# Altium PCB MiniPC.PcbDoc (part 10 of 24)
Units mm, origin at the board's own origin, x right, y up, seen from the top; angles counter-clockwise.
Board outline 175 x 155 mm, 16 copper layers (1_Top, 2_int1_(gnd), 3_int2_(power), 4_int3_(gnd), 5_int4_(sign), 6_int5_(power), 7_int6_(sign), 8_int7_(power), 9_int8_(gnd), 10_int9_(sign), 11_int10_(gnd), 12_int11_(sign), 13_int12_(gnd), 14_int13_(power), 15_int14_(gnd), 16_Bottom), stack 2.008 mm thick; 1046 components, 837 nets, 6010 pads, 4009 vias.
Unrouted connection lines stored in the file: 564.
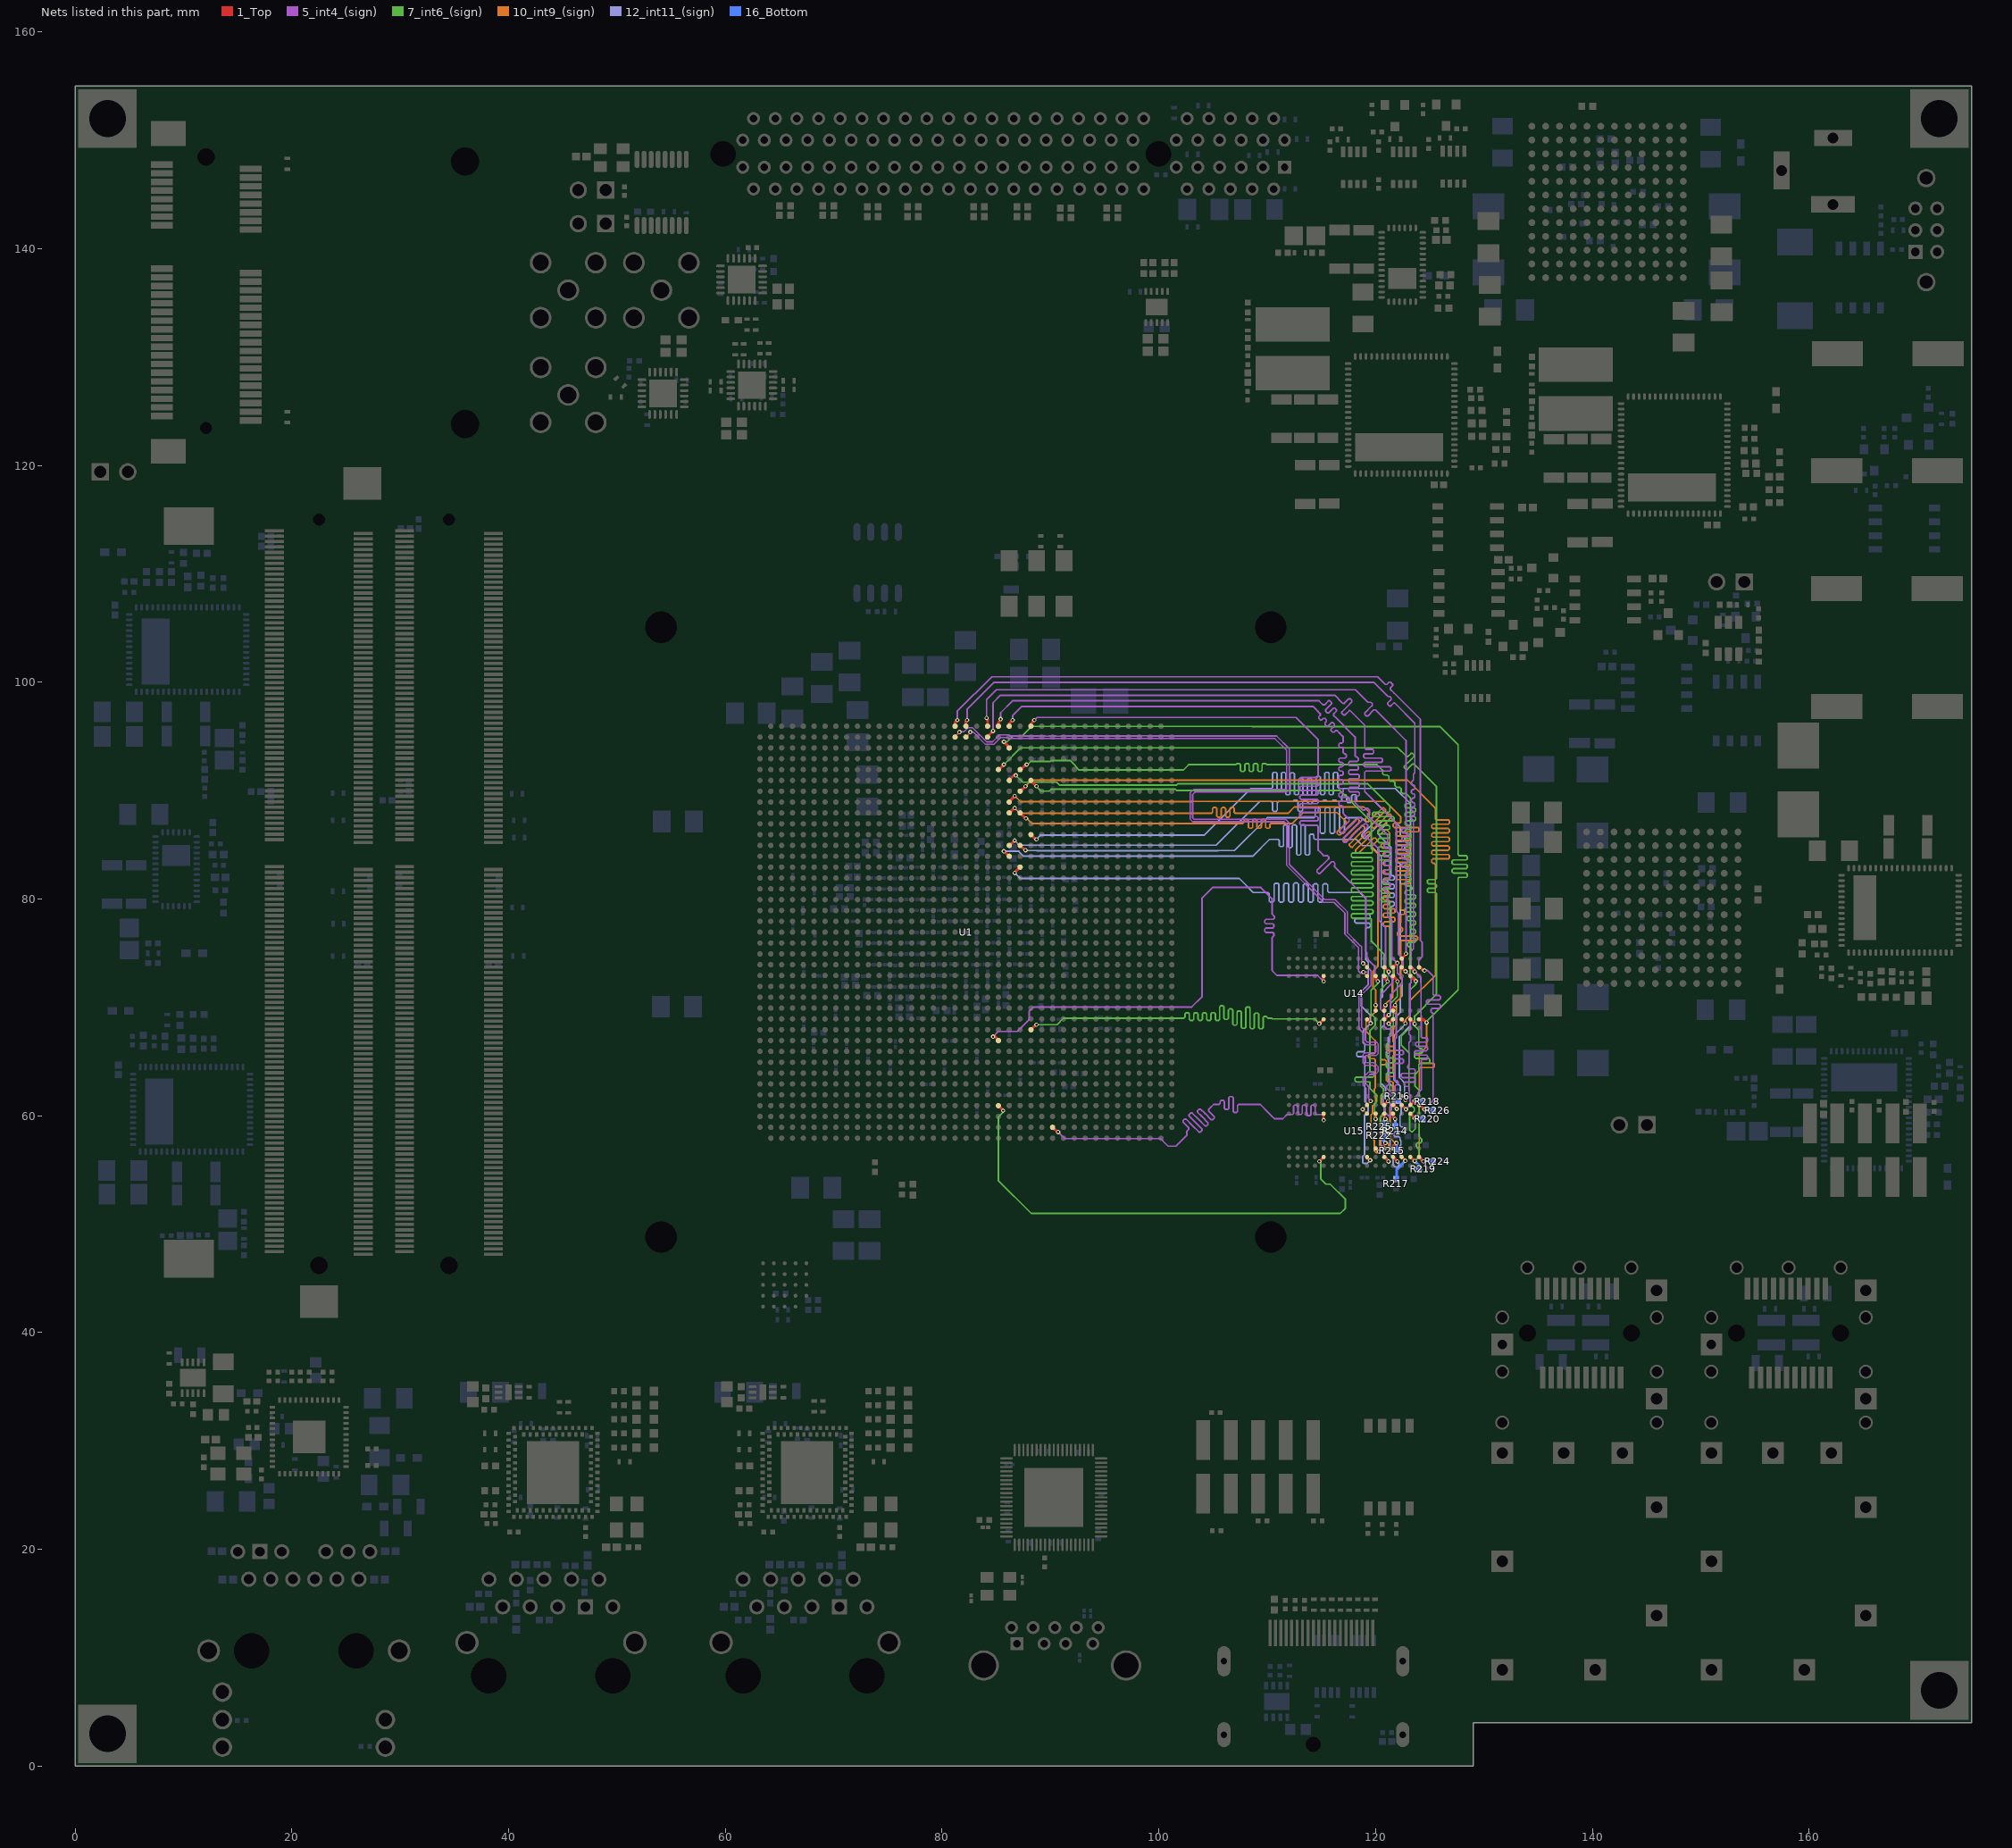
[diagram p22: the nets of this part, all layers, seen from the top]

## Via types
v1: diameter 0.4, hole 0.2, 1_Top to 16_Bottom, tented both sides, 1658 vias
v2: diameter 0.5, hole 0.2, 1_Top to 16_Bottom, tented both sides, 1014 vias
v3: diameter 0.7, hole 0.3, 1_Top to 16_Bottom, tented both sides, 915 vias
v4: diameter 0.6, hole 0.2, 1_Top to 16_Bottom, tented both sides, 278 vias
v5: diameter 0.4, hole 0.2, 1_Top to 16_Bottom, 93 vias
v6: diameter 0.4/0/0/0/0/0/0/0/0/0/0/0/0/0/0/0.4 (per signal layer), hole 0.2, 1_Top to 16_Bottom, tented both sides, 18 vias
v7: diameter 0.4/0/0/0/0/0/0/0/0/0/0/0.4/0.4/0.4/0.4/0.4 (per signal layer), hole 0.2, 1_Top to 16_Bottom, tented both sides, 16 vias
v8: diameter 0.5, hole 0.254, 1_Top to 16_Bottom, tented both sides, 15 vias
v9: diameter 0.5, hole 0.2, 1_Top to 16_Bottom, 2 vias

## Nets (pads, with @x,y where several pads share a name; then routed paths per layer and width w, separated by ;. In a path a pad name is that pad's centre, name@x,y a point inside that pad or via, vN(x,y) a via of type N, cw(c..) or ccw(c..) an arc to the next point about the centre after c; other vN are vias at no path point) (continued)
DDR4_A3: R214.2 U1.F24 U14.N7 U15.N7 | length 89.1
  1_Top w0.25: U1.F24@86.194,90.939 86.194,90.994 86.6,91.4 v1(86.8,91.4) ; U15.N7@121.6,60.2 121.6,59.922 121.8,59.722 v1(121.8,59.7) ; U14.N7@121.6,72.9 122,72.5 v1(122,72.4)
  7_int6_(sign) w0.15: v1(86.8,91.4) 87.425,90.775 90.575,90.775 90.85,90.5 101.625,90.5 101.75,90.625 119.275,90.625 121.3,88.6 121.3,88.4 121.3,88.1 121.2,88 119.821,88 119.721,87.9 119.721,87.7 119.821,87.6 121.3,87.6 121.59,87.6 121.69,87.5 121.69,87.3 121.59,87.2 121.3,87.2 120.21,87.2 120.11,87.1 120.11,86.9 120.21,86.8 121.2,86.8 121.3,86.7 121.3,86.5 121.2,86.4 120.316,86.4 120.216,86.3 120.216,86.1 120.316,86 121.2,86 121.3,85.9 121.3,85.7 121.2,85.6 120.316,85.6 120.216,85.5 120.216,85.3 120.316,85.2 121.2,85.2 121.3,85.1 121.3,84.9 121.2,84.8 120.316,84.8 120.216,84.7 120.216,84.5 120.316,84.4 121.2,84.4 121.3,84.3 121.3,84.1 121.2,84 120.316,84 120.216,83.9 120.216,83.7 120.316,83.6 121.2,83.6 121.3,83.5 121.3,83.2 121.3,83 121.3,82.35 121.3,82.15 121.3,81.85 121.2,81.75 120.748,81.75 120.648,81.65 120.648,81.45 120.748,81.35 121.2,81.35 121.3,81.25 121.3,81.05 121.2,80.95 120.604,80.95 120.504,80.85 120.504,80.65 120.604,80.55 121.2,80.55 121.3,80.45 121.3,80.25 121.2,80.15 120.604,80.15 120.504,80.05 120.504,79.85 120.604,79.75 121.2,79.75 121.3,79.65 121.3,79.2 121.3,73.801 121.625,73.476 121.625,72.9 122,72.525 v1(122,72.4) 122,71 121.375,70.376 121.375,69.825 121.625,69.575 121.625,68.676 121.625,68.324 121.4,68.099 121.4,67.449 121.3,67.349 121.3,67.124 121.3,66.786 121.188,66.674 121.097,66.674 120.985,66.561 120.985,66.336 121.097,66.224 121.188,66.224 121.3,66.111 121.3,65.886 121.188,65.774 121.097,65.774 120.985,65.661 120.985,65.436 121.097,65.324 121.3,65.324 121.653,65.324 121.765,65.211 121.765,64.986 121.653,64.874 121.3,64.874 121.097,64.874 120.985,64.761 120.985,64.536 121.097,64.424 121.3,64.424 121.597,64.424 121.709,64.311 121.709,64.086 121.597,63.974 121.3,63.974 121.097,63.974 120.985,63.861 120.985,63.636 121.097,63.524 121.188,63.524 121.3,63.411 121.3,63.4 121.3,62.4 121.6,62.1 121.6,61.079 121.425,60.904 121.425,60.175 121.8,59.8 v1(121.8,59.7)
  16_Bottom w0.25: R214.2@121.8,59.025 v1@121.8,59.7
DDR4_A4: R215.2 U1.H24 U14.N3 U15.N3 | length 95.6
  1_Top w0.25: U1.H24@86.194,88.939 86.194,88.994 v1(86.7,89.5) ; U15.N3@121.6,57 121.6,57.2 121.903,57.503 v1(121.906,57.503) ; U14.N3@121.6,69.7 121.6,70 v1(121.8,70.2)
  10_int9_(sign) w0.15: v1(86.7,89.5) 87.21,88.99 103.036,88.99 103.05,89.004 120.896,89.004 122.3,87.6 122.3,87.4 122.3,87.1 122.2,87 121.714,87 121.614,86.9 121.614,86.7 121.714,86.6 122.3,86.6 123.899,86.6 123.999,86.5 123.999,86.3 123.899,86.2 122.3,86.2 121.991,86.2 121.891,86.1 121.891,85.9 121.991,85.8 122.3,85.8 123.069,85.8 123.169,85.7 123.169,85.5 123.069,85.4 122.3,85.4 121.991,85.4 121.891,85.3 121.891,85.1 121.991,85 122.3,85 123.069,85 123.169,84.9 123.169,84.7 123.069,84.6 122.3,84.6 121.991,84.6 121.891,84.5 121.891,84.3 121.991,84.2 122.3,84.2 123.069,84.2 123.169,84.1 123.169,83.9 123.069,83.8 122.3,83.8 121.991,83.8 121.891,83.7 121.891,83.5 121.991,83.4 122.3,83.4 123.069,83.4 123.169,83.3 123.169,83.1 123.069,83 122.3,83 121.991,83 121.891,82.9 121.891,82.7 121.991,82.6 122.3,82.6 123.069,82.6 123.169,82.5 123.169,82.3 123.069,82.2 122.3,82.2 121.991,82.2 121.891,82.1 121.891,81.9 121.991,81.8 122.3,81.8 123.069,81.8 123.169,81.7 123.169,81.5 123.069,81.4 122.4,81.4 122.3,81.3 122.3,81.1 122.3,79.175 122.3,79.075 122.4,78.975 122.588,78.975 122.688,78.875 122.688,78.675 122.588,78.575 122.4,78.575 122.3,78.475 122.3,78.175 122.3,77.798 122.277,77.775 122.177,77.675 122.177,77.475 122.277,77.375 122.3,77.375 122.378,77.375 122.478,77.275 122.478,77.075 122.378,76.975 122.3,76.975 122.118,76.975 122.018,76.875 122.018,76.675 122.118,76.575 122.3,76.575 123.772,76.575 123.872,76.475 123.872,76.275 123.772,76.175 122.4,76.175 122.3,76.075 122.3,75.35 122.3,74.701 122.425,74.576 122.425,73.924 122.3,73.799 122.3,72.701 122.425,72.576 122.425,72.224 122.3,72.099 122.3,70.938 122.285,70.923 122.285,70.885 121.85,70.45 121.85,70.25 v1(121.8,70.2) 121.9,70.1 121.9,68.4 121.6,68.1 121.6,67 121.6,66.881 121.681,66.8 121.781,66.7 121.781,66.5 121.681,66.4 121.6,66.4 121.085,66.4 120.985,66.3 120.985,66.1 121.085,66 121.6,66 121.676,66 121.776,65.9 121.776,65.7 121.676,65.6 121.6,65.524 121.6,65.3 121.6,64.3 121.6,64.128 121.653,64.075 121.765,63.963 121.765,63.738 121.653,63.625 121.6,63.625 121.097,63.625 120.985,63.513 120.985,63.288 121.097,63.175 121.488,63.175 121.6,63.063 121.6,63 121.6,61.079 121.325,60.804 121.325,59.776 121.325,57.975 121.8,57.5 121.803,57.503 v1(121.906,57.503)
  16_Bottom w0.25: v1(121.906,57.503) 121.925,57.484 R215.2@121.925,56.8
DDR4_A5: R216.2 U1.B22 U14.P8 U15.P8 | length 95.2
  1_Top w0.25: U1.B22@84.194,94.939 84.194,94.994 v1(84.7,95.5) ; U15.P8@122.4,61 v1(122.8,60.6) ; U14.P8@122.4,73.7 122.75,73.35 v1(122.75,73.328)
  5_int4_(sign) w0.15: v1(84.7,95.5) 84.7,98.1 85.39,98.79 116.235,98.79 116.9,98.125 116.971,98.054 117.112,98.054 117.518,98.46 117.66,98.46 117.801,98.319 117.801,98.178 117.324,97.701 116.885,97.261 116.885,97.12 117.026,96.978 117.168,96.978 117.577,97.388 117.637,97.388 119,96.025 119,94 119,93.9 119.1,93.8 119.716,93.8 119.816,93.7 119.816,93.5 119.716,93.4 119,93.4 118.9,93.3 118.9,93.1 119,93 120.516,93 120.616,92.9 120.616,92.7 120.516,92.6 119,92.6 118.9,92.5 118.9,92.3 119,92.2 121.316,92.2 121.416,92.1 121.416,91.9 121.316,91.8 119.1,91.8 119,91.7 119,91.3 119,89.9 121.9,87 121.9,78.9 122.1,78.7 122.1,74.9 122.275,74.725 122.525,74.475 122.525,73.553 v1(122.75,73.328) 123.275,72.803 123.275,72.296 123.175,72.196 123.175,67.976 123.075,67.876 123.075,67.524 123.225,67.374 123.225,66.924 123.075,66.774 123.075,65.7 123.075,64.733 123.062,64.72 123.075,64.72 122.975,64.62 122.975,64.42 123.075,64.32 123.547,64.32 123.647,64.22 123.647,64.02 123.547,63.92 123.075,63.92 122.46,63.92 122.36,63.82 122.36,63.62 122.46,63.52 123.075,63.52 123.547,63.52 123.647,63.42 123.647,63.22 123.547,63.12 123.075,63.12 122.728,63.12 122.628,63.02 122.628,62.82 122.728,62.72 122.975,62.72 123.075,62.62 123.075,62.52 123.075,62.024 123.175,61.924 123.175,60.975 v1(122.8,60.6)
  16_Bottom w0.25: R216.2@122,61.375 122.025,61.375 v1(122.8,60.6)
DDR4_A6: R217.2 U1.G25 U14.P2 U15.P2 | length 94.4
  1_Top w0.25: U1.G25@87.194,89.939 87.239,89.939 v1(87.7,90.4) ; U15.P2@122.4,56.2 122.739,55.861 122.73,55.852 v1(122.73,55.848) ; U14.P2@122.4,68.9 122.772,68.528 v1(122.75,68.528)
  10_int9_(sign) w0.15: v1(87.7,90.4) 88.258,90.958 122.942,90.958 125.5,88.4 125.5,87.5 125.5,87.4 125.6,87.3 126.702,87.3 126.802,87.2 126.802,87 126.702,86.9 125.5,86.9 125.278,86.9 125.178,86.8 125.178,86.6 125.278,86.5 125.5,86.5 126.702,86.5 126.802,86.4 126.802,86.2 126.702,86.1 125.5,86.1 125.278,86.1 125.178,86 125.178,85.8 125.278,85.7 125.5,85.7 126.702,85.7 126.802,85.6 126.802,85.4 126.702,85.3 125.5,85.3 125.278,85.3 125.178,85.2 125.178,85 125.278,84.9 125.5,84.9 126.702,84.9 126.802,84.8 126.802,84.6 126.702,84.5 125.5,84.5 125.278,84.5 125.178,84.4 125.178,84.2 125.278,84.1 125.5,84.1 126.702,84.1 126.802,84 126.802,83.8 126.702,83.7 125.5,83.7 125.278,83.7 125.178,83.6 125.178,83.4 125.278,83.3 125.4,83.3 125.5,83.2 125.5,81.125 125.5,72.95 123.17,70.62 123.17,69.291 123.12,69.241 123.12,69.215 122.755,68.85 122.755,68.533 v1(122.75,68.528)
  12_int11_(sign) w0.15: v1(122.73,55.848) 122.247,56.331 122.247,57.243 122.331,57.327 122.331,57.679 122.247,57.763 122.247,57.9 122.247,57.963 122.135,58.075 121.807,58.075 121.695,58.188 121.695,58.413 121.807,58.525 122.247,58.525 122.693,58.525 122.805,58.638 122.805,58.863 122.693,58.975 122.36,58.975 122.247,59.088 122.247,59.2 122.247,60.048 122.364,60.165 122.364,60.815 122.275,60.904 122.275,62.722 122,62.997 122.003,63 121.68,63.323 121.68,67.206 121.695,67.221 121.695,67.409 122.75,68.464 v1(122.75,68.528)
  16_Bottom w0.25: R217.2@121.87,54.175 121.925,54.23 121.925,55.025 122.73,55.83 v1(122.73,55.848)
DDR4_A7: R218.2 U1.A20 U14.R8 U15.R8 | length 90.6
  1_Top w0.25: U1.A20@82.194,95.939 82.194,96.394 v1(82.3,96.5) ; U15.R8@123.2,61 v1(123.6,61.4) ; U14.R8@123.2,73.7 v1(123.6,73.3)
  5_int4_(sign) w0.15: v1(82.3,96.5) 82.3,97.5 84.79,99.99 119.835,99.99 121,98.825 121.135,98.69 121.148,98.69 121.289,98.69 121.43,98.548 121.43,98.407 121.424,98.401 121.116,98.093 121.116,97.951 121.258,97.81 121.399,97.81 121.677,98.088 121.737,98.088 123.615,96.21 123.615,91.625 123.49,91.5 123.49,91.3 123.49,90.98 123.41,90.9 123.31,90.8 123.31,90.6 123.41,90.5 123.49,90.5 123.515,90.5 123.615,90.4 123.615,90.2 123.515,90.1 123.49,90.1 123.41,90.1 123.31,90 123.31,89.8 123.41,89.7 123.49,89.7 123.515,89.7 123.615,89.6 123.615,89.4 123.515,89.3 123.49,89.3 123.41,89.3 123.31,89.2 123.31,89 123.41,88.9 123.49,88.9 123.515,88.9 123.615,88.8 123.615,88.6 123.515,88.5 123.49,88.5 123.41,88.5 123.31,88.4 123.31,88.2 123.41,88.1 123.49,88.1 123.515,88.1 123.615,88 123.615,87.8 123.515,87.7 123.49,87.7 123.41,87.7 123.31,87.6 123.31,87.4 123.41,87.3 123.49,87.3 123.49,75.425 123.275,75.21 123.275,73.804 v1@123.639,73.439 ; v1(123.6,61.4) 123.6,61.699 123.925,62.024 123.925,62.125 124.2,62.4 124.2,65.1 124.3,65.2 124.68,65.2 124.78,65.3 124.78,65.5 124.68,65.6 124.2,65.6 123.695,65.6 123.595,65.7 123.595,65.9 123.695,66 124.2,66 124.68,66 124.78,66.1 124.78,66.3 124.68,66.4 124.2,66.4 123.793,66.4 123.693,66.5 123.693,66.7 123.793,66.8 124.2,66.8 124.68,66.8 124.78,66.9 124.78,67.1 124.68,67.2 124.3,67.2 124.2,67.3 124.2,67.4 124.2,69.203 124.179,69.224 124.179,72.292 124.175,72.296 124.175,72.725 v1(123.6,73.3)
  16_Bottom w0.25: v1(123.6,61.4) 123.7,61.3 R218.2@124.325,61.3
DDR4_A8: R219.2 U1.E23 U14.R2 U15.R2 | length 89.8
  1_Top w0.25: U1.E23@85.194,91.939 85.239,91.939 v1(85.7,92.4) ; U15.R2@123.2,56.2 123.222,56.2 v1(123.6,55.822) ; U14.R2@123.2,68.9 123.6,68.5 v1(123.6,68.478)
  7_int6_(sign) w0.15: v1(85.7,92.4) 87.25,93.95 122.05,93.95 122.775,93.225 122.846,93.154 122.987,93.154 123.266,93.433 123.407,93.433 123.549,93.292 123.549,93.15 123.199,92.801 122.643,92.244 122.643,92.103 122.784,91.961 122.926,91.961 123.411,92.447 123.553,92.447 123.612,92.388 125.6,90.4 125.6,82.4 125.6,82.2 125.6,81.9 125.5,81.8 124.873,81.8 124.773,81.7 124.773,81.5 124.873,81.4 125.5,81.4 125.6,81.3 125.6,81.1 125.5,81 124.873,81 124.773,80.9 124.773,80.7 124.873,80.6 125.5,80.6 125.6,80.5 125.6,80.2 125.6,80.1 125.6,71.201 123.6,69.201 v1(123.6,68.478) 123.6,68.276 123.98,67.896 123.98,66.4 123.98,66.317 124.093,66.205 124.22,66.205 124.332,66.092 124.332,65.867 124.22,65.755 123.98,65.755 123.697,65.755 123.585,65.642 123.585,65.417 123.697,65.305 123.98,65.305 124.878,65.305 124.99,65.192 124.99,64.967 124.878,64.855 124.093,64.855 123.98,64.742 123.98,64.405 123.98,64.18 123.635,63.835 123.635,62.725 124.025,62.335 124.025,58.17 124.025,58.058 124.137,57.945 124.25,57.833 124.25,57.608 124.137,57.495 124.025,57.495 123.868,57.495 123.755,57.383 123.755,57.158 123.868,57.045 123.95,57.045 124.025,56.97 124.025,56.225 123.622,55.822 v1(123.6,55.822)
  16_Bottom w0.25: v1(123.6,55.822) 123.975,55.447 R219.2@123.975,55.1
DDR4_A9: R220.2 U1.E25 U14.R7 U15.R7 | length 97.4
  1_Top w0.25: U1.E25@87.194,91.939 87.261,91.939 87.721,92.4 v1(87.8,92.4) ; U15.R7@123.2,60.2 123.6,59.8 v1(123.6,59.75) ; v1(123.7,72.422) 123.392,72.73 ; 123.392,72.73 123.37,72.73 U14.R7@123.2,72.9 123.222,72.9 123.392,72.73
  7_int6_(sign) w0.15: v1(87.8,92.4) 87.8,92.3 88.2,92.7 89.984,92.7 90.065,92.781 91.82,92.781 92.3,92.301 92.3,92.245 92.645,91.9 102.25,91.9 102.75,92.4 106.925,92.4 107.125,92.4 107.215,92.49 107.435,92.49 107.525,92.4 107.525,91.869 107.625,91.769 107.825,91.769 107.925,91.869 107.925,92.4 108.015,92.49 108.235,92.49 108.325,92.4 108.325,91.869 108.425,91.769 108.625,91.769 108.725,91.869 108.725,92.4 108.815,92.49 109.035,92.49 109.125,92.4 109.125,91.869 109.225,91.769 109.425,91.769 109.525,91.869 109.525,92.4 109.615,92.49 109.835,92.49 109.925,92.4 111.7,92.4 120.115,92.4 120.3,92.215 120.441,92.074 120.654,91.861 120.654,91.72 120.648,91.715 120.648,91.573 120.789,91.432 120.931,91.432 120.936,91.437 121.078,91.437 121.219,91.296 121.219,91.154 121.214,91.149 121.214,91.007 121.355,90.866 121.497,90.866 121.502,90.872 121.644,90.872 121.785,90.73 121.785,90.589 121.779,90.583 121.779,90.442 121.921,90.3 122.062,90.3 122.068,90.306 122.209,90.306 122.351,90.164 122.351,90.023 122.345,90.018 122.345,89.876 122.487,89.735 122.628,89.735 122.633,89.74 122.775,89.74 122.987,89.528 123.225,89.29 123.225,89.2 123.225,88.9 123.125,88.8 122.8,88.8 122.7,88.7 122.7,88.5 122.8,88.4 123.225,88.4 123.59,88.4 123.69,88.3 123.69,88.1 123.59,88 123.225,88 122.81,88 122.71,87.9 122.71,87.7 122.81,87.6 123.225,87.6 123.59,87.6 123.69,87.5 123.69,87.3 123.59,87.2 123.225,87.2 122.81,87.2 122.71,87.1 122.71,86.9 122.81,86.8 123.125,86.8 123.225,86.7 123.225,86.5 123.125,86.4 122.81,86.4 122.71,86.3 122.71,86.1 122.81,86 123.125,86 123.225,85.9 123.225,85.7 123.125,85.6 122.81,85.6 122.71,85.5 122.71,85.3 122.81,85.2 123.125,85.2 123.225,85.1 123.225,84.9 123.125,84.8 122.81,84.8 122.71,84.7 122.71,84.5 122.81,84.4 123.125,84.4 123.225,84.3 123.225,84.1 123.125,84 122.81,84 122.71,83.9 122.71,83.7 122.81,83.6 123.125,83.6 123.225,83.5 123.225,83.3 123.125,83.2 122.81,83.2 122.71,83.1 122.71,82.9 122.81,82.8 123.125,82.8 123.225,82.7 123.225,82.5 123.125,82.4 122.81,82.4 122.71,82.3 122.71,82.1 122.81,82 123.125,82 123.225,81.9 123.225,81.7 123.125,81.6 122.81,81.6 122.71,81.5 122.71,81.3 122.81,81.2 123.225,81.2 123.232,81.2 123.332,81.1 123.332,80.9 123.232,80.8 123.225,80.8 122.81,80.8 122.71,80.7 122.71,80.5 122.81,80.4 123.225,80.4 123.59,80.4 123.69,80.3 123.69,80.1 123.59,80 123.225,80 122.81,80 122.71,79.9 122.71,79.7 122.81,79.6 123.225,79.6 123.59,79.6 123.69,79.5 123.69,79.3 123.59,79.2 123.225,79.2 122.81,79.2 122.71,79.1 122.71,78.9 122.81,78.8 123.225,78.8 123.59,78.8 123.69,78.7 123.69,78.5 123.59,78.4 123.225,78.4 122.999,78.4 122.899,78.3 122.899,78.1 122.999,78 123.225,78 123.59,78 123.69,77.9 123.69,77.7 123.59,77.6 123.325,77.6 123.225,77.5 123.225,77.3 123.325,77.2 123.59,77.2 123.69,77.1 123.69,76.9 123.59,76.8 123.325,76.8 123.225,76.7 123.225,76.5 123.325,76.4 123.59,76.4 123.69,76.3 123.69,76.1 123.59,76 123.225,76 123.036,76 122.936,75.9 122.936,75.7 123.036,75.6 123.125,75.6 123.225,75.5 123.225,75.4 123.225,74.774 123.175,74.724 123.175,73.124 123.7,72.599 v1(123.7,72.422) 123.7,72.125 123.175,71.6 123.175,70.024 ; 123.175,70.024 123.175,68.175 122.375,67.375 122.375,66.5 123.075,65.8 123.075,61.704 123.164,61.615 123.164,61.116 123.57,60.71 123.57,60.47 123.125,60.025 123.125,58.696 123.281,58.54 123.41,58.54 123.655,58.785 123.655,59.695 v1(123.6,59.75)
  16_Bottom w0.25: v1(123.6,59.75) 123.65,59.7 R220.2@124.325,59.7 R220.2@124.475,59.7
DDR4_A10: R222.2 U1.J24 U14.M3 U15.M3 | length 95.8
  1_Top w0.25: U1.J24@86.194,87.939 86.7,88.445 v1(86.7,88.4) ; U15.M3@120.8,57 120.8,57.4 v1(120.9,57.5) ; U14.M3@120.811,69.689 U14.M3@120.8,69.7 120.8,70.1 v1(120.9,70.2)
  10_int9_(sign) w0.15: v1(86.7,88.4) 87.2,87.9 104.75,87.9 104.85,87.9 104.95,88 104.95,88.333 105.05,88.433 105.25,88.433 105.35,88.333 105.35,87.9 105.35,87.646 105.45,87.546 105.65,87.546 105.75,87.646 105.75,87.9 105.75,88.333 105.85,88.433 106.05,88.433 106.15,88.333 106.15,87.9 106.15,87.646 106.25,87.546 106.45,87.546 106.55,87.646 106.55,87.9 106.55,88.333 106.65,88.433 106.85,88.433 106.95,88.333 106.95,88 107.05,87.9 108.125,87.9 111.9,87.9 112.49,88.49 118.91,88.49 119.1,88.3 119.241,88.159 119.454,87.946 119.454,87.805 119.055,87.406 119.055,87.265 119.196,87.123 119.337,87.123 119.807,87.593 120.621,88.407 120.763,88.407 120.904,88.266 120.904,88.124 120.09,87.31 119.62,86.84 119.62,86.699 119.762,86.557 119.903,86.557 120.373,87.027 121.187,87.841 121.328,87.841 121.47,87.7 121.47,87.559 120.656,86.744 120.186,86.275 120.186,86.133 120.327,85.992 120.469,85.992 120.868,86.391 121.009,86.391 121.221,86.179 121.3,86.1 121.3,85.9 121.3,85.5 121.3,85.2 121.2,85.1 120.6,85.1 120.5,85 120.5,84.8 120.6,84.7 121.2,84.7 121.3,84.6 121.3,84.4 121.2,84.3 120.816,84.3 120.716,84.2 120.716,84 120.816,83.9 121.2,83.9 121.3,83.8 121.3,83.6 121.2,83.5 120.816,83.5 120.716,83.4 120.716,83.2 120.816,83.1 121.2,83.1 121.3,83 121.3,82.8 121.2,82.7 120.816,82.7 120.716,82.6 120.716,82.4 120.816,82.3 121.2,82.3 121.3,82.2 121.3,82 121.2,81.9 120.816,81.9 120.716,81.8 120.716,81.6 120.816,81.5 121.2,81.5 121.3,81.4 121.3,81.2 121.2,81.1 120.816,81.1 120.716,81 120.716,80.8 120.816,80.7 121.2,80.7 121.3,80.6 121.3,80.4 121.2,80.3 120.816,80.3 120.716,80.2 120.716,80 120.816,79.9 121.2,79.9 121.3,79.8 121.3,79.6 121.2,79.5 120.816,79.5 120.716,79.4 120.716,79.2 120.816,79.1 121.3,79.1 121.684,79.1 121.784,79 121.784,78.8 121.684,78.7 121.3,78.7 120.816,78.7 120.716,78.6 120.716,78.4 120.816,78.3 121.3,78.3 121.684,78.3 121.784,78.2 121.784,78 121.684,77.9 121.3,77.9 120.816,77.9 120.716,77.8 120.716,77.6 120.816,77.5 121.2,77.5 121.3,77.4 121.3,77.3 121.3,74 121.699,73.601 121.699,72.701 121.575,72.576 121.575,70.975 120.9,70.3 121,70.2 v1(120.9,70.2) 120.775,70.075 120.775,69.448 120.775,69.096 120.475,68.796 120.475,65.4 120.475,65.287 120.587,65.175 120.865,65.175 120.977,65.063 120.977,64.838 120.865,64.725 120.587,64.725 120.475,64.613 120.475,64.275 120.475,64.2 120.475,62.726 120.725,62.476 120.725,62.124 120.5,61.899 120.5,61.101 120.825,60.776 120.825,60.326 120.475,59.976 120.475,58.003 120.37,57.898 120.37,57.23 120.475,57.125 ; 120.476,57.125 120.601,57 121.14,57 121.21,57.07 121.21,57.38 121.09,57.5 v1(120.9,57.5) 120.932,57.532 v1@120.932,57.546
  16_Bottom w0.25: R222.2@120.725,58.2 120.725,57.675 v1(120.9,57.5)
DDR4_A11: R224.2 U1.C24 U14.T2 U15.T2 | length 95.7
  1_Top w0.25: v1(85.7,94.5) 85.7,94.479 86.239,93.939 U1.C24@86.194,93.939 ; U15.T2@124,56.2 v1(124.4,55.8) ; U14.T2@124,68.9 124.4,68.9 v1(124.7,68.6)
  7_int6_(sign) w0.15: v1(85.7,94.5) 86,94.5 86.53,95.03 87.355,95.03 88.25,95.925 108.575,95.925 108.6,95.9 125.95,95.9 127.6,94.25 127.6,84.2 127.6,84.1 127.7,84 128.354,84 128.454,83.9 128.454,83.7 128.354,83.6 127.6,83.6 127.161,83.6 127.061,83.5 127.061,83.3 127.161,83.2 127.6,83.2 128.354,83.2 128.454,83.1 128.454,82.9 128.354,82.8 127.6,82.8 127.161,82.8 127.061,82.7 127.061,82.5 127.161,82.4 127.6,82.4 128.354,82.4 128.454,82.3 128.454,82.1 128.354,82 127.7,82 127.6,81.9 127.6,81.5 127.6,71.6 124.6,68.6 v1(124.7,68.6)
  10_int9_(sign) w0.15: v1(124.4,55.8) 124,56.2 124,56.443 124.003,56.446 124.003,56.798 124.025,56.82 124.025,63.85 124.025,64.05 124.025,64.35 124.125,64.45 125.323,64.45 125.423,64.55 125.423,64.75 125.323,64.85 124.125,64.85 124.025,64.95 124.025,65.3 124.025,65.725 124.7,66.4 v1(124.7,68.6)
  16_Bottom w0.25: v1(124.4,55.8) R224.2@125.275,55.8
DDR4_A12: R225.2 U1.F26 U14.M7 U15.M7 | length 97
  1_Top w0.25: U1.F26@88.194,90.939 88.194,90.906 v1(88.7,90.4) ; U15.M7@120.8,60.2 120.8,59.7 v1(120.9,59.7) ; U14.M7@120.8,72.9 120.8,72.7 v1(121.1,72.4)
  7_int6_(sign) w0.15: v1(88.7,90.4) 88.7,90.375 89.125,89.95 89.88,89.95 90.055,90.125 101.529,90.125 101.629,90.025 116.675,90.025 119.6,87.1 119.6,87 119.6,84.64 119.606,84.634 119.6,84.634 119.7,84.534 119.7,84.334 119.6,84.234 117.854,84.234 117.754,84.134 117.754,83.934 117.854,83.834 119.6,83.834 119.7,83.734 119.7,83.534 119.6,83.434 117.854,83.434 117.754,83.334 117.754,83.134 117.854,83.034 119.6,83.034 119.646,83.034 119.746,82.934 119.746,82.734 119.646,82.634 119.6,82.634 117.854,82.634 117.754,82.534 117.754,82.334 117.854,82.234 119.6,82.234 119.646,82.234 119.746,82.134 119.746,81.934 119.646,81.834 119.6,81.834 117.854,81.834 117.754,81.734 117.754,81.534 117.854,81.434 119.6,81.434 119.646,81.434 119.746,81.334 119.746,81.134 119.646,81.034 119.6,81.034 117.854,81.034 117.754,80.934 117.754,80.734 117.854,80.634 119.6,80.634 119.646,80.634 119.746,80.534 119.746,80.334 119.646,80.234 119.6,80.234 117.854,80.234 117.754,80.134 117.754,79.934 117.854,79.834 119.6,79.834 119.646,79.834 119.746,79.734 119.746,79.534 119.646,79.434 119.6,79.434 117.854,79.434 117.754,79.334 117.754,79.134 117.854,79.034 119.6,79.034 119.646,79.034 119.746,78.934 119.746,78.734 119.646,78.634 119.6,78.634 117.854,78.634 117.754,78.534 117.754,78.334 117.854,78.234 119.5,78.234 119.6,78.134 119.6,78.034 119.6,76.1 120.775,74.925 120.775,73.124 121.1,72.799 v1(121.1,72.4) 121.1,72.3 120.475,71.675 120.475,69.826 120.775,69.526 120.775,69.124 120.775,69.074 120.475,68.774 120.475,62.726 120.725,62.476 120.725,62.124 120.575,61.974 120.575,61.225 120.825,60.975 120.825,60.225 120.425,59.825 120.425,58.835 120.67,58.59 121.11,58.59 121.325,58.805 121.325,59.275 v1(120.9,59.7) v1@120.825,59.775
  16_Bottom w0.25: R225.2@120.725,59 120.725,59.525 v1(120.9,59.7)
DDR4_A13: R226.2 U1.A19 U14.T8 U15.T8 | length 91
  1_Top w0.25: U1.A19@81.194,95.939 81.194,96.294 v1(81.4,96.5) ; U15.T8@124,61 124.1,61 v1(124.5,60.6) ; U14.T8@124,73.7 124.1,73.7 124.4,73.4 v1(124.5,73.4)
  5_int4_(sign) w0.15: v1(81.4,96.5) 81.4,97.321 84.579,100.5 120.2,100.5 120.805,99.895 120.902,99.798 121.032,99.798 121.237,100.004 121.367,100.004 121.561,99.809 121.561,99.68 121.356,99.474 121.356,99.344 121.705,98.995 124.125,96.575 124.125,87.589 124.125,76.175 124.3,76 124.3,74.701 123.975,74.376 123.975,73.825 124.4,73.4 v1(124.5,73.4) 124.8,73.4 125.3,72.9 125.3,71.96 125.3,71.2 125.4,71.1 125.872,71.1 125.972,71 125.972,70.8 125.872,70.7 125.3,70.7 124.801,70.7 124.701,70.6 124.701,70.4 124.801,70.3 125.3,70.3 125.872,70.3 125.972,70.2 125.972,70 125.872,69.9 125.3,69.9 125.2,69.9 125.1,69.8 125.1,69.6 125.2,69.5 125.3,69.4 125.3,69.3 125.3,61.4 v1(124.5,60.6)
  16_Bottom w0.25: v1(124.5,60.6) 124.6,60.5 R226.2@125.275,60.5
DDR4_ACT: U1.J25 U14.L3 U15.L3 | length 87.3
  1_Top w0.25: U1.J25@87.194,87.939 87.7,87.433 v1(87.733,87.433) ; U15.L3@120,57 v1(120.3,56.7) ; U14.L3@120,69.7 v1(120,70.2)
  10_int9_(sign) w0.15: v1(87.733,87.433) 87.817,87.433 88.275,86.975 107.65,86.975 107.75,86.975 107.85,87.075 107.85,87.222 107.95,87.322 108.15,87.322 108.25,87.222 108.25,86.975 108.25,86.628 108.35,86.528 108.55,86.528 108.65,86.628 108.65,86.975 108.65,87.222 108.75,87.322 108.95,87.322 109.05,87.222 109.05,86.975 109.05,86.628 109.15,86.528 109.35,86.528 109.45,86.628 109.45,86.975 109.45,87.222 109.55,87.322 109.75,87.322 109.85,87.222 109.85,86.975 109.85,86.628 109.95,86.528 110.15,86.528 110.25,86.628 110.25,86.875 110.35,86.975 110.725,86.975 112.325,86.975 113.33,87.98 116.42,87.98 116.9,87.5 117.041,87.359 117.254,87.146 117.254,87.005 116.446,86.198 116.446,86.057 116.588,85.915 116.729,85.915 117.607,86.793 118.195,87.381 118.336,87.381 118.478,87.239 118.478,87.098 117.89,86.51 117.012,85.632 117.012,85.491 117.154,85.349 117.295,85.349 118.173,86.227 118.697,86.751 118.838,86.751 118.979,86.61 118.979,86.468 118.456,85.944 117.578,85.067 117.578,84.925 117.719,84.784 117.861,84.784 118.738,85.662 119.262,86.185 119.404,86.185 119.545,86.044 119.545,85.902 119.021,85.379 118.144,84.501 118.144,84.359 118.285,84.218 118.426,84.218 119.304,85.096 119.828,85.62 119.969,85.62 120.111,85.478 120.111,85.337 119.658,84.884 119.658,84.742 119.75,84.65 120.2,84.2 120.2,73.779 119.77,73.349 119.77,71.83 120,71.6 v1(120,70.2) 120,69.601 119.114,68.715 119.114,67.785 119.964,66.935 119.964,66.4 119.964,66.175 119.964,65.838 119.851,65.725 119.446,65.725 119.334,65.613 119.334,65.388 119.446,65.275 119.851,65.275 119.964,65.163 119.964,65.1 119.964,62.565 119.875,62.476 119.875,62.124 120,61.999 120,61.201 119.725,60.926 119.725,60.226 119.575,60.076 119.575,58.026 119.89,57.711 119.89,56.75 120.04,56.6 120.3,56.6 v1(120.3,56.7)
DDR4_ALERT0: U1.L26 U15.P9 | length 92.3
  1_Top w0.25: U1.L26@88.194,85.939 88.633,85.5 v1(88.7,85.5) ; U15.P9@122.4,61.8 122.739,61.461 v1(122.739,61.439)
  12_int11_(sign) w0.15: v1(88.7,85.5) 89.1,85.9 104.2,85.9 108.5,90.2 110.3,90.2 110.4,90.2 110.5,90.3 110.5,91.58 110.6,91.68 110.8,91.68 110.9,91.58 110.9,90.2 111,90.1 111.2,90.1 111.3,90.2 111.3,91.58 111.4,91.68 111.6,91.68 111.7,91.58 111.7,90.2 111.7,89.72 111.8,89.62 112,89.62 112.1,89.72 112.1,90.2 112.1,91.537 112.2,91.637 112.4,91.637 112.5,91.537 112.5,90.2 112.5,89.72 112.6,89.62 112.8,89.62 112.9,89.72 112.9,90.2 112.9,91.027 113,91.127 113.2,91.127 113.3,91.027 113.3,90.2 113.3,89.72 113.4,89.62 113.6,89.62 113.7,89.72 113.7,90.2 113.7,91.027 113.8,91.127 114,91.127 114.1,91.027 114.1,90.2 114.1,89.72 114.2,89.62 114.4,89.62 114.5,89.72 114.5,90.2 114.5,91.216 114.6,91.316 114.8,91.316 114.9,91.216 114.9,90.2 114.9,89.72 115,89.62 115.2,89.62 115.3,89.72 115.3,90.2 115.3,91.58 115.4,91.68 115.6,91.68 115.7,91.58 115.7,90.2 115.7,89.72 115.8,89.62 116,89.62 116.1,89.72 116.1,90.2 116.1,91.58 116.2,91.68 116.4,91.68 116.5,91.58 116.5,90.3 116.6,90.2 117.6,90.2 121.8,90.2 123.225,88.775 123.225,73.924 123.175,73.874 123.175,73.152 123.175,72.748 123.275,72.648 123.275,72.296 123.125,72.147 123.125,70.398 123.147,70.376 123.147,69.268 123.175,69.241 123.175,68.352 123.17,68.347 123.17,68.29 122.19,67.31 122.19,63.534 122.665,63.059 122.665,61.513 v1(122.739,61.439)
DDR4_ALERT1: U1.A22 U14.P9 | length 70.6
  1_Top w0.25: v1(84.1,96.7) v1@84.194,96.7 ; U1.A22@84.194,95.939 v1@84.194,96.7 ; U14.P9@122.4,74.5 122.8,74.9 v1(122.8,74.95) ; v1@84.194,96.7 84.2,96.7 84.194,96.706 v1@84.194,96.7
  5_int4_(sign) w0.15: v1(84.1,96.7) 84.1,98.4 85,99.3 118.125,99.3 119.2,98.225 119.271,98.154 119.412,98.154 119.554,98.154 119.695,98.013 119.695,97.871 119.624,97.801 118.99,97.166 118.99,97.025 119.131,96.883 119.273,96.883 119.836,97.447 119.978,97.447 120.888,96.538 122.8,94.625 122.8,91.011 122.8,87.189 122.8,87.1 122.8,86.98 122.88,86.9 122.98,86.8 122.98,86.6 122.88,86.5 122.8,86.5 122.51,86.5 122.41,86.4 122.41,86.2 122.51,86.1 122.8,86.1 122.88,86.1 122.98,86 122.98,85.8 122.88,85.7 122.8,85.7 122.51,85.7 122.41,85.6 122.41,85.4 122.51,85.3 122.8,85.3 122.88,85.3 122.98,85.2 122.98,85 122.88,84.9 122.8,84.9 122.51,84.9 122.41,84.8 122.41,84.6 122.51,84.5 122.8,84.5 122.88,84.5 122.98,84.4 122.98,84.2 122.88,84.1 122.8,84.1 122.51,84.1 122.41,84 122.41,83.8 122.51,83.7 122.8,83.7 122.88,83.7 122.98,83.6 122.98,83.4 122.88,83.3 122.8,83.3 122.51,83.3 122.41,83.2 122.41,83 122.51,82.9 122.8,82.9 122.88,82.9 122.98,82.8 122.98,82.6 122.88,82.5 122.8,82.42 122.8,82.4 v1(122.8,74.95)
DDR4_BA0: U1.M24 U14.N2 U15.N2 | length 84.1
  1_Top w0.25: U1.M24@86.194,84.939 86.239,84.939 v1(86.7,85.4) ; v1(121.2,68.5) U14.N2@121.6,68.9 ; U15.N2@121.6,56.2 122,55.8 v1(122,55.79)
  12_int11_(sign) w0.15: v1(86.7,85.4) 87.13,84.97 105.27,84.97 109.3,89 109.8,89 110.025,89 110.362,89 110.475,88.888 110.475,88.197 110.587,88.085 110.812,88.085 110.925,88.197 110.925,88.888 111.037,89 111.375,89 111.7,89 111.925,89 112.375,89 112.485,89.11 112.715,89.11 112.825,89 112.825,88.197 112.937,88.085 113.162,88.085 113.275,88.197 113.275,89 113.385,89.11 113.615,89.11 113.725,89 113.725,88.915 113.837,88.803 114.062,88.803 114.175,88.915 114.175,89 114.285,89.11 114.515,89.11 114.625,89 115.075,89 115.185,89.11 115.415,89.11 115.525,89 115.97,89 115.975,89.005 116.087,89.117 116.312,89.117 116.425,89.005 116.43,89 116.762,89 116.875,89.112 116.875,89.503 116.987,89.615 117.212,89.615 117.325,89.503 117.325,89 117.437,88.888 117.662,88.888 117.775,89 117.775,89.503 117.887,89.615 118.112,89.615 118.225,89.503 118.225,89.112 118.337,89 119.9,89 122.275,86.625 122.275,85.925 122.275,85.825 122.375,85.725 122.571,85.725 122.671,85.625 122.671,85.425 122.571,85.325 122.275,85.325 122.013,85.325 121.913,85.225 121.913,85.025 122.013,84.925 122.275,84.925 122.571,84.925 122.671,84.825 122.671,84.625 122.571,84.525 122.275,84.525 122.079,84.525 121.979,84.425 121.979,84.225 122.079,84.125 122.275,84.125 122.571,84.125 122.671,84.025 122.671,83.825 122.571,83.725 122.275,83.725 122.079,83.725 121.979,83.625 121.979,83.425 122.079,83.325 122.175,83.325 122.275,83.225 122.275,82.85 122.275,74.725 122.425,74.575 122.425,73.924 122.275,73.774 122.275,72.726 122.425,72.576 122.425,71.05 122.275,70.9 122.275,70.124 122.275,69.575 v1(121.2,68.5) 121.625,68.075 121.625,67.862 121.325,67.562 121.325,67.374 121.17,67.219 121.17,66.7 121.17,66.475 121.17,66.098 121.097,66.025 120.985,65.913 120.985,65.688 121.097,65.575 121.17,65.502 121.17,65.125 121.17,64.92 121.17,64.695 121.17,64.245 121.17,63.795 121.17,63.345 121.17,63.31 121.17,63.111 121.564,62.718 121.564,62.279 121.825,62.018 121.825,61.663 121.564,61.402 121.564,60.964 121.425,60.825 121.425,60.075 121.325,59.975 121.325,59.776 121.325,59.424 121.325,58.987 121.075,58.737 121.075,58.363 121.325,58.113 121.325,57.676 121.325,57.324 ; 121.325,57.324 121.325,56.475 121.613,56.187 121.613,55.467 121.8,55.28 121.99,55.28 122.14,55.43 122.14,55.65 v1(122,55.79) v1@122,55.8
DDR4_BA1: U1.A23 U14.N8 U15.N8 | length 92.1
  1_Top w0.25: U1.A23@85.194,95.939 85.194,96.294 85.4,96.5 v1(85.4,96.6) ; U15.N8@121.6,61 121.939,60.661 v1(121.939,60.639) ; U14.N8@121.6,73.7 v1(122,74.1)
  5_int4_(sign) w0.15: v1(85.4,96.6) 85.4,97.179 86.501,98.28 114.77,98.28 115.063,97.988 115.133,97.917 115.275,97.917 115.638,98.28 115.779,98.28 115.921,98.139 115.921,97.997 115.487,97.563 115.382,97.459 115.382,97.317 115.524,97.176 115.665,97.176 115.77,97.28 116.096,97.607 116.237,97.607 116.379,97.465 116.379,97.324 116.123,97.068 116.123,96.927 116.313,96.738 118.1,94.95 118.1,93.3 118.1,93.2 118.2,93.1 118.3,93.1 118.4,93 118.4,92.8 118.3,92.7 118.1,92.7 117.61,92.7 117.51,92.6 117.51,92.4 117.61,92.3 118.1,92.3 118.3,92.3 118.4,92.2 118.4,92 118.3,91.9 118.1,91.9 117.61,91.9 117.51,91.8 117.51,91.6 117.61,91.5 118.1,91.5 118.39,91.5 118.49,91.4 118.49,91.2 118.39,91.1 118.1,91.1 117.61,91.1 117.51,91 117.51,90.8 117.61,90.7 118.1,90.7 118.39,90.7 118.49,90.6 118.49,90.4 118.39,90.3 118.1,90.3 117.61,90.3 117.51,90.2 117.51,90 117.61,89.9 118.1,89.9 118.4,89.9 118.5,89.8 118.5,89.6 118.4,89.5 118.2,89.5 118.1,89.4 118.1,89.3 118.1,88.9 118.715,88.285 118.812,88.188 118.942,88.188 119.124,88.37 119.254,88.37 119.448,88.176 119.448,88.046 119.266,87.864 119.266,87.734 119.545,87.455 121.1,85.9 121.1,85.7 121.1,85.5 121.1,85.2 121,85.1 120.895,85.1 120.795,85 120.795,84.8 120.895,84.7 121.1,84.7 121.265,84.7 121.365,84.6 121.365,84.4 121.265,84.3 121.1,84.3 120.935,84.3 120.835,84.2 120.835,84 120.935,83.9 121.1,83.9 121.265,83.9 121.365,83.8 121.365,83.6 121.265,83.5 121.1,83.5 120.935,83.5 120.835,83.4 120.835,83.2 120.935,83.1 121.1,83.1 121.265,83.1 121.365,83 121.365,82.8 121.265,82.7 121.1,82.7 120.935,82.7 120.835,82.6 120.835,82.4 120.935,82.3 121.1,82.3 121.265,82.3 121.365,82.2 121.365,82 121.265,81.9 121.1,81.9 120.935,81.9 120.835,81.8 120.835,81.6 120.935,81.5 121.1,81.5 121.265,81.5 121.365,81.4 121.365,81.2 121.265,81.1 121.1,81.1 120.935,81.1 120.835,81 120.835,80.8 120.935,80.7 121,80.7 121.1,80.6 121.1,80.4 121.1,78.4 121.5,78 121.5,74.6 v1(122,74.1) ; v1(121.939,60.639) v1@121.939,60.661 ; v1(122,74.1) 122,73.2 122.425,72.775 122.425,72.224 121.375,71.174 121.375,69.825 121.9,69.3 121.9,67.2 121.765,67.065 121.765,66.5 121.765,66.44 121.765,66.14 121.865,66.04 122.465,66.04 122.565,65.94 122.565,65.74 122.465,65.64 121.865,65.64 121.765,65.54 121.765,65.34 121.865,65.24 122.465,65.24 122.565,65.14 122.565,64.94 122.465,64.84 121.865,64.84 121.765,64.74 121.765,64.44 121.765,64.24 121.765,63.44 121.765,63.34 121.865,63.24 121.975,63.24 122.075,63.14 122.075,62.94 121.975,62.84 121.865,62.84 121.765,62.74 121.765,62.52 121.765,60.914 ; 121.765,60.914 121.765,60.835 v1@121.939,60.661 ; 121.765,60.914 121.939,60.74 v1@121.939,60.661
DDR4_BG0: U1.N24 U15.M2 | length 84
  1_Top w0.25: v1(85.7,84.4) 85.9,84.2 ; U15.M2@120.8,56.2 121.1,55.9 121.165,55.9 121.104,55.839 121.152,55.79 v1(121.188,55.79) ; 85.9,84.2 86.161,83.939 U1.N24@86.194,83.939 85.933,84.2 85.9,84.2
  12_int11_(sign) w0.15: v1(85.7,84.4) 87.079,84.4 87.528,83.95 108.65,83.95 110.2,85.5 110.5,85.5 110.7,85.5 111,85.5 111.1,85.4 111.1,84.938 111.2,84.838 111.4,84.838 111.5,84.938 111.5,85.5 111.5,86.74 111.6,86.84 111.8,86.84 111.9,86.74 111.9,85.5 111.9,84.851 112,84.751 112.2,84.751 112.3,84.851 112.3,85.5 112.3,86.74 112.4,86.84 112.6,86.84 112.7,86.74 112.7,85.5 112.7,84.16 112.8,84.06 113,84.06 113.1,84.16 113.1,85.5 113.1,86.74 113.2,86.84 113.4,86.84 113.5,86.74 113.5,85.5 113.5,84.16 113.6,84.06 113.8,84.06 113.9,84.16 113.9,85.5 113.9,85.882 114,85.982 114.2,85.982 114.3,85.882 114.3,85.6 114.4,85.5 118.2,85.5 118.782,84.918 119.542,84.918 120.526,83.934 120.526,73.753 120.775,73.504 120.775,73.152 120.625,73.002 120.625,70.975 120.475,70.825 120.475,69.826 120.775,69.526 120.775,68.352 120.475,68.052 120.475,63.025 120.9,62.6 120.9,62 120.625,61.725 120.625,60.976 120.825,60.776 120.825,60.326 120.475,59.976 120.475,57.324 120.725,57.074 120.725,56.524 120.725,56.374 121.188,55.911 v1(121.188,55.79)
DDR4_BG1: U1.M25 U14.M2 | length 77.3
  1_Top w0.25: U1.M25@87.194,84.939 87.633,84.5 v1(87.7,84.5) ; U14.M2@120.8,68.9 v1(121.2,69.3)
  12_int11_(sign) w0.15: v1(87.7,84.5) 87.725,84.475 88.705,84.475 88.72,84.46 105.482,84.46 105.496,84.475 106.975,84.475 110,87.5 114.2,87.5 114.312,87.5 114.425,87.612 114.425,88.332 114.537,88.445 114.762,88.445 114.875,88.332 114.875,87.5 114.875,86.168 114.987,86.055 115.212,86.055 115.325,86.168 115.325,87.5 115.325,88.332 115.437,88.445 115.662,88.445 115.775,88.332 115.775,87.5 115.775,86.168 115.887,86.055 116.112,86.055 116.225,86.168 116.225,87.5 116.225,88.332 116.337,88.445 116.562,88.445 116.675,88.332 116.675,87.5 116.675,86.168 116.787,86.055 117.012,86.055 117.125,86.168 117.125,87.388 117.237,87.5 117.575,87.5 117.7,87.5 118.7,87.5 118.859,87.341 119.098,87.102 119.257,87.102 120.055,87.9 120.214,87.9 120.373,87.741 120.373,87.582 119.495,86.705 118.718,85.927 118.718,85.768 118.877,85.609 119.036,85.609 119.814,86.386 120.691,87.264 120.85,87.264 121.01,87.105 121.01,86.946 120.211,86.148 120.211,85.989 120.45,85.75 121.425,84.775 121.425,82.35 121.425,82.25 121.525,82.15 121.618,82.15 121.718,82.05 121.718,81.85 121.618,81.75 121.425,81.75 121.183,81.75 121.083,81.65 121.083,81.45 121.183,81.35 121.425,81.35 121.618,81.35 121.718,81.25 121.718,81.05 121.618,80.95 121.425,80.95 121.183,80.95 121.083,80.85 121.083,80.65 121.183,80.55 121.425,80.55 121.618,80.55 121.718,80.45 121.718,80.25 121.618,80.15 121.425,80.15 121.183,80.15 121.083,80.05 121.083,79.85 121.183,79.75 121.425,79.75 121.618,79.75 121.718,79.65 121.718,79.45 121.618,79.35 121.525,79.35 121.425,79.25 121.425,78.825 121.425,73.676 121.625,73.476 121.625,73.124 121.525,73.024 121.525,72.576 ; v1(121.2,69.3) 121.375,69.475 121.375,70.725 121.525,70.875 121.525,72.576
DDR4_CAS: U1.A24 U14.M8 U15.M8 | length 91.8
  1_Top w0.25: U1.A24@86.194,95.939 86.194,96.194 v1(86.5,96.5) ; U15.M8@120.8,61 121.139,61.339 v1(121.139,61.361) ; U14.M8@120.8,73.7 v1(121.2,73.3)
  5_int4_(sign) w0.15: v1(86.5,96.5) 86.5,96.9 87.37,97.77 114.209,97.77 114.539,97.439 114.681,97.298 114.893,97.086 114.893,96.944 114.756,96.807 114.756,96.666 114.897,96.524 115.038,96.524 115.176,96.662 115.317,96.662 115.459,96.52 115.459,96.379 115.321,96.241 115.321,96.1 115.463,95.959 115.604,95.959 115.812,96.167 115.916,96.271 116.058,96.271 116.199,96.129 116.199,95.988 116.095,95.884 115.887,95.676 115.887,95.534 116.028,95.393 116.17,95.393 116.307,95.53 116.449,95.53 116.661,95.318 116.944,95.035 117,94.979 117,94.779 117,94.479 116.9,94.379 116.71,94.379 116.61,94.279 116.61,94.079 116.71,93.979 116.996,93.979 117,93.975 117,93.6 117,93.5 117.1,93.4 117.189,93.4 117.289,93.3 117.289,93.1 117.189,93 117,93 116.71,93 116.61,92.9 116.61,92.7 116.71,92.6 116.9,92.6 117,92.5 117,92.3 116.9,92.2 116.71,92.2 116.61,92.1 116.61,91.9 116.71,91.8 116.9,91.8 117,91.7 117,91.5 116.9,91.4 116.71,91.4 116.61,91.3 116.61,91.1 116.71,91 116.9,91 117,90.9 117,90.7 116.9,90.6 116.71,90.6 116.61,90.5 116.61,90.3 116.71,90.2 116.9,90.2 117,90.1 117,89.9 116.9,89.8 116.71,89.8 116.61,89.7 116.61,89.5 116.71,89.4 117,89.4 117.49,89.4 117.59,89.3 117.59,89.1 117.49,89 117,89 116.71,89 116.61,88.9 116.61,88.7 116.71,88.6 116.9,88.6 117,88.5 117,87.9 117.2,87.7 117.341,87.559 117.554,87.346 117.554,87.205 116.711,86.362 116.711,86.221 116.852,86.08 116.994,86.08 117.907,86.993 118.438,87.524 118.579,87.524 118.721,87.382 118.721,87.241 118.19,86.71 116.972,85.492 116.972,85.351 117.114,85.209 117.255,85.209 118.473,86.427 118.991,86.945 119.132,86.945 119.273,86.804 119.273,86.662 118.826,86.215 118.826,86.074 119.26,85.64 120.3,84.6 120.3,78 120.9,77.4 120.9,73.6 v1(121.2,73.3) 121.2,73.001 121.525,72.676 121.525,72.224 120.475,71.174 120.475,69.826 120.775,69.526 120.775,69.124 120.775,68.252 121.002,68.025 121.375,68.025 121.5,67.9 121.5,67.5 121.255,67.255 121.255,62.975 121,62.72 121,62.57 121.37,62.2 121.37,61.91 121.24,61.78 120.91,61.78 120.7,61.57 120.7,60.902 120.775,60.827 120.775,60.275 120.9,60.15 121.051,60.15 121.19,60.01 121.35,60.01 121.49,60.15 121.49,60.36 121.375,60.475 121.375,61.125 v1(121.139,61.361)
DDR4_CKE: U1.P25 U14.K2 U15.K2 | length 85
  1_Top w0.25: v1(86.7,82.4) 86.7,82.445 U1.P25@87.194,82.939 ; U15.K2@119.2,56.2 119.2,56.1 119.461,55.839 119.5,55.878 v1(119.5,55.9) ; U14.K2@119.2,68.9 119.2,68.878 v1(119.539,68.539)
  12_int11_(sign) w0.15: v1(86.7,82.4) 87.2,81.9 107.4,81.9 108.7,80.6 109.5,80.6 109.725,80.6 110.062,80.6 110.175,80.487 110.175,79.827 110.287,79.715 110.512,79.715 110.625,79.827 110.625,80.6 110.625,81.334 110.737,81.447 110.962,81.447 111.075,81.334 111.075,80.6 111.075,79.827 111.187,79.715 111.412,79.715 111.525,79.827 111.525,80.6 111.525,81.334 111.637,81.447 111.862,81.447 111.975,81.334 111.975,80.6 111.975,79.827 112.087,79.715 112.312,79.715 112.425,79.827 112.425,80.6 112.425,81.373 112.537,81.485 112.762,81.485 112.875,81.373 112.875,80.6 112.875,79.827 112.987,79.715 113.212,79.715 113.325,79.827 113.325,80.6 113.325,81.282 113.437,81.394 113.662,81.394 113.775,81.282 113.775,80.6 113.775,79.827 113.887,79.715 114.112,79.715 114.225,79.827 114.225,80.6 114.225,81.282 114.337,81.394 114.562,81.394 114.675,81.282 114.675,80.6 114.675,79.827 114.787,79.715 115.012,79.715 115.125,79.827 115.125,80.6 115.125,81.282 115.237,81.394 115.462,81.394 115.575,81.282 115.575,80.712 115.687,80.6 116.4,80.6 118.53,80.6 119.075,80.055 119.075,78.775 119.075,78.675 119.175,78.575 119.393,78.575 119.493,78.475 119.493,78.275 119.393,78.175 119.075,78.175 118.175,78.175 118.075,78.075 118.075,77.875 118.175,77.775 119.075,77.775 119.393,77.775 119.493,77.675 119.493,77.475 119.393,77.375 119.175,77.375 119.075,77.275 119.075,77 119.075,74.426 119.325,74.176 119.325,72.125 118.675,71.475 118.675,70.124 118.924,69.875 ; 118.924,69.875 119.499,69.3 119.499,68.579 v1(119.539,68.539) 118.86,67.86 118.86,66.719 119,66.579 119,66.354 119,66.016 118.888,65.904 118.364,65.904 118.252,65.791 118.252,65.566 118.364,65.454 118.888,65.454 119,65.341 119,65.3 119,61.299 119.305,60.994 119.305,60.4 118.975,60.07 118.975,56.425 118.8,56.25 118.8,55.69 118.89,55.6 119.2,55.6 v1(119.5,55.9)
DDR4_CLK_N: U1.B19 U14.K8 U15.K8 | length 91.6
  1_Top w0.15: U1.B19@81.194,94.939 81.194,94.994 v1(81.6,95.4) ; v1(118.839,74.061) U14.K8@119.2,73.7 ; U15.K8@119.2,61 119.539,61.339 v1(119.539,61.361)
  5_int4_(sign) w0.13: v1(81.6,95.4) 81.625,95.425 82.025,95.425 82.4,95.8 82.8,95.8 84.1,94.5 84.661,94.5 85.296,95.135 86.091,95.135 86.186,95.04 89.543,95.04 89.549,95.035 89.851,95.035 ; 89.851,95.035 89.951,95.035 89.956,95.04 90.543,95.04 90.549,95.035 90.951,95.035 90.956,95.04 98.409,95.04 98.424,95.055 98.926,95.055 98.941,95.04 109.4,95.04 110.86,95.04 112.04,93.86 112.04,90.101 111.799,89.86 103.335,89.86 103.115,89.64 103.115,87.474 103.219,87.37 111.63,87.37 111.669,87.37 112.04,86.999 112.04,83.2 115.3,79.94 116.259,79.94 117.4,78.799 117.4,76.87 118.57,75.7 118.6,75.7 118.7,75.6 118.7,74.2 v1(118.839,74.061) 118.899,74.061 119.565,73.396 119.565,72.026 118.685,71.145 118.685,70.128 118.7,70.113 118.7,68.187 119.055,67.832 119.055,66.955 119.21,66.8 120.061,66.8 120.245,66.616 120.245,65.752 120.053,65.56 119.1,65.56 119.055,65.515 119.055,65 119.155,64.9 119.86,64.9 120.245,64.515 120.245,64.105 119.95,63.81 119.46,63.81 119.055,63.405 119.055,63.005 119.375,62.685 119.375,61.525 v1(119.539,61.361) v1@119.504,61.361
DDR4_CLK_P: U1.B20 U14.K7 U15.K7 | length 91.2
  1_Top w0.15: U1.B20@82.194,94.939 82.6,95.345 v1(82.6,95.4) ; v1(118.8,60.6) U15.K7@119.2,60.2 ; v1(118.861,73.261) 118.861,73.239 U14.K7@119.2,72.9
  5_int4_(sign) w0.13: v1(82.6,95.4) 82.861,95.4 84.001,94.26 84.76,94.26 85.395,94.895 85.951,94.895 86.046,94.8 89.444,94.8 89.449,94.795 89.95,94.795 90.051,94.795 90.056,94.8 90.444,94.8 90.449,94.795 91.05,94.795 91.056,94.8 98.509,94.8 98.524,94.815 98.826,94.815 98.841,94.8 109.499,94.8 110.7,94.8 111.8,93.7 111.8,90.2 111.7,90.1 103.2,90.1 102.875,89.775 102.875,87.375 103.12,87.13 105.07,87.13 111.57,87.13 111.8,86.9 111.8,83.101 115.201,79.7 116.16,79.7 117.16,78.7 117.16,76.77 118.415,75.515 118.415,73.355 118.63,73.14 118.74,73.14 v1(118.861,73.261) 119.239,73.261 119.3,73.2 119.3,72.1 118.445,71.245 118.445,70.029 118.46,70.013 118.46,68.027 118.815,67.672 118.815,66.856 119.111,66.56 119.901,66.56 120.005,66.456 120.005,65.905 119.9,65.8 119.001,65.8 118.815,65.614 118.815,64.901 119.055,64.66 119.761,64.66 120.005,64.416 120.005,64.204 119.851,64.05 119.361,64.05 118.815,63.504 118.815,62.845 119.135,62.525 119.135,60.935 v1(118.8,60.6)
DDR4_CSN: U1.A26 U14.L7 U15.L7 | length 92.9
  1_Top w0.25: U1.A26@88.194,95.939 88.194,96.194 v1(88.5,96.5) ; v1(120,59.7) U15.L7@120,60.2 ; U14.L7@120,72.9 120,72.6 v1(120.2,72.4)
  5_int4_(sign) w0.15: v1(88.5,96.5) 88.75,96.75 112.65,96.75 114.7,94.7 114.7,91.8 114.7,91.6 114.7,91.3 114.6,91.2 113.108,91.2 113.008,91.1 113.008,90.9 113.108,90.8 114.6,90.8 114.7,90.7 114.7,90.5 114.6,90.4 113.108,90.4 113.008,90.3 113.008,90.1 113.108,90 114.6,90 114.7,89.9 114.7,89.7 114.6,89.6 113.108,89.6 113.008,89.5 113.008,89.3 113.108,89.2 114.6,89.2 114.7,89.1 114.7,88.9 114.6,88.8 113.108,88.8 113.008,88.7 113.008,88.5 113.108,88.4 114.6,88.4 114.7,88.3 114.7,88.1 114.6,88 113.108,88 113.008,87.9 113.008,87.7 113.108,87.6 114.6,87.6 114.7,87.5 114.7,87.3 114.6,87.2 113.108,87.2 113.008,87.1 113.008,86.9 113.108,86.8 114.6,86.8 114.7,86.7 114.7,86.4 114.7,85.9 114.7,84.5 115.15,84.05 115.221,83.979 115.362,83.979 115.387,84.004 115.528,84.004 115.67,83.863 115.67,83.721 115.574,83.626 114.592,82.643 114.592,82.502 114.733,82.36 114.875,82.36 115.857,83.343 115.952,83.438 116.094,83.438 116.235,83.297 116.235,83.155 116.211,83.131 116.211,82.989 116.375,82.825 119.1,80.1 119.1,75.151 119.175,75.076 119.175,74.525 119.925,73.775 119.925,72.782 120.3,72.407 120.293,72.4 v1(120.2,72.4)
  7_int6_(sign) w0.15: v1(120,59.7) 119.9,59.8 119.9,61.101 120.1,61.301 120.1,61.899 119.475,62.524 119.475,63.1 119.45,63.125 118.197,63.125 118.084,63.238 118.084,63.463 118.197,63.575 119.475,63.575 119.743,63.575 119.855,63.688 119.855,63.913 119.743,64.025 119.587,64.025 119.475,64.138 119.475,64.475 119.475,64.7 119.475,64.725 119.475,65.175 119.475,65.625 119.475,66.075 119.475,66.3 119.475,66.4 119.475,67.874 119.964,68.363 119.964,69.035 119.575,69.424 119.575,71.575 120.2,72.2 v1(120.2,72.4)
DDR4_DM0: U1.AV28 U15.E7 | length 48.1
  1_Top w0.25: U1.AV28@90.194,58.939 90.667,58.467 90.7,58.433 v1(90.7,58.5) ; v1(115.2,59.6) U15.E7@115.2,60.2
  5_int4_(sign) w0.15: v1(90.7,58.5) 91.3,57.9 100.15,57.9 100.85,57.2 101.575,57.2 102.575,58.2 102.575,58.575 102.675,58.675 102.746,58.746 102.746,58.887 102.223,59.409 102.223,59.551 102.365,59.692 102.506,59.692 103.099,59.099 103.692,58.506 103.834,58.506 103.975,58.648 103.975,58.789 103.382,59.382 102.789,59.975 102.789,60.117 102.931,60.258 103.072,60.258 103.665,59.665 104.258,59.072 104.399,59.072 104.541,59.213 104.541,59.355 103.948,59.948 103.569,60.326 103.569,60.468 103.711,60.609 103.852,60.609 104.231,60.231 104.824,59.638 104.965,59.638 105.106,59.779 105.106,59.92 104.584,60.443 104.584,60.584 104.796,60.796 105.05,61.05 105.25,61.05 105.55,61.05 105.65,61.15 105.65,61.319 105.75,61.419 105.95,61.419 106.05,61.319 106.05,61.05 106.05,60.685 106.15,60.585 106.35,60.585 106.45,60.685 106.45,61.05 106.45,61.668 106.55,61.768 106.75,61.768 106.85,61.668 106.85,61.05 106.85,60.406 106.95,60.306 107.15,60.306 107.25,60.406 107.25,60.95 107.35,61.05 107.65,61.05 109.35,61.05 110.141,60.259 ; 110.283,60.117 110.141,60.259 ; v1(115.2,59.6) 115.2,60 115.075,60.125 114.824,60.125 114.524,60.125 114.424,60.225 114.424,60.888 114.324,60.988 114.124,60.988 114.024,60.888 114.024,60.125 114.024,60.112 113.924,60.012 113.724,60.012 113.624,60.112 113.624,60.125 113.624,60.888 113.524,60.988 113.324,60.988 113.224,60.888 113.224,60.225 113.124,60.125 112.924,60.125 112.824,60.225 112.824,60.888 112.724,60.988 112.524,60.988 112.424,60.888 112.424,60.225 112.324,60.125 112.024,60.125 111.824,60.125 111.434,59.735 110.665,59.735 110.424,59.976 110.141,60.259
DDR4_DM1: U1.AT23 U15.E2 | length 47
  1_Top w0.25: U1.AT23@85.194,60.939 85.658,60.475 v1(85.625,60.475) ; v1(114.8,55.8) 114.95,55.95 114.961,55.939 U15.E2@115.261,56.239
  7_int6_(sign) w0.15: v1(85.625,60.475) 85.625,60.325 85.19,59.89 85.19,54.035 88.225,51 116.72,51 117.21,51.49 117.21,52.29 115.8,53.7 115.4,53.7 114.925,54.175 114.925,55.675 v1(114.8,55.8)
DDR4_DM2: U1.AK23 U14.E7 | length 53.8
  1_Top w0.25: v1(84.7,67.3) 84.8,67.4 85.194,67.006 U1.AK23@85.194,66.939 ; v1(115.2,72.4) U14.E7@115.2,72.9
  5_int4_(sign) w0.15: v1(84.7,67.3) 85.18,67.78 86.935,67.78 88.045,68.89 88.045,69.675 88.4,70.03 103.02,70.03 103.99,71 103.99,80.107 104.943,81.06 109.41,81.06 110.44,80.03 110.44,78.72 110.44,78.62 110.54,78.52 110.64,78.42 110.64,78.22 110.54,78.12 110.44,78.12 109.87,78.12 109.77,78.02 109.77,77.82 109.87,77.72 110.44,77.72 110.5,77.72 110.6,77.62 110.6,77.42 110.5,77.32 110.44,77.32 109.87,77.32 109.77,77.22 109.77,77.02 109.87,76.92 110.44,76.92 110.5,76.92 110.6,76.82 110.6,76.62 110.5,76.52 ; 110.51,76.52 110.531,76.52 ; 110.54,76.52 110.44,76.42 110.44,75.65 110.44,73.41 110.9,72.95 114.65,72.95 v1(115.2,72.4)
DDR4_DM3: U1.AJ26 U14.E2 | length 46.9
  1_Top w0.25: U1.AJ26@88.194,67.939 v1@88.677,68.423 ; v1(114.8,68.5) U14.E2@115.2,68.9
  7_int6_(sign) w0.15: v1(88.7,68.4) 90.6,68.4 91.2,69 102.21,69 102.31,69 102.41,69.1 102.41,69.4 102.51,69.5 102.71,69.5 102.81,69.4 102.81,69 102.81,68.906 102.91,68.806 103.11,68.806 103.21,68.906 103.21,69 103.21,69.4 103.31,69.5 103.51,69.5 103.61,69.4 103.61,69 103.61,68.906 103.71,68.806 103.91,68.806 104.01,68.906 104.01,69 104.01,69.4 104.11,69.5 104.31,69.5 104.41,69.4 104.41,69 104.41,68.906 104.51,68.806 104.71,68.806 104.81,68.906 104.81,69 104.81,69.41 104.91,69.51 105.11,69.51 105.21,69.41 105.21,69 105.21,68.906 105.31,68.806 105.51,68.806 105.61,68.906 105.61,69 105.61,70.048 105.71,70.148 105.91,70.148 106.01,70.048 106.01,69 106.11,68.9 106.31,68.9 106.41,69 106.41,69.77 106.51,69.87 106.71,69.87 106.81,69.77 106.81,69 106.81,68.466 106.91,68.366 107.11,68.366 107.21,68.466 107.21,69 107.21,69.57 107.31,69.67 107.51,69.67 107.61,69.57 107.61,69 107.61,68.169 107.71,68.069 107.91,68.069 108.01,68.169 108.01,69 108.01,69.938 108.11,70.038 108.31,70.038 108.41,69.938 108.41,69 108.41,68.14 108.51,68.04 108.71,68.04 108.81,68.14 108.81,69 108.81,69.37 108.91,69.47 109.11,69.47 109.21,69.37 109.21,69 109.21,68.14 109.31,68.04 109.51,68.04 109.61,68.14 109.61,69 109.61,69.06 109.71,69.16 109.91,69.16 110.01,69.06 110.07,69 110.4,69 110.464,68.936 114.364,68.936 v1(114.8,68.5)